# Altium PCB Analizador_PCB.PcbDoc (part 1 of 2)
Units mil, origin at the board's own origin, x right, y up, seen from the top; angles counter-clockwise.
Board outline 3920 x 3040 mil, 2 copper layers (Top Layer, Bottom Layer); 151 components, 106 nets, 476 pads, 730 vias.
Unrouted connection lines stored in the file: 111.
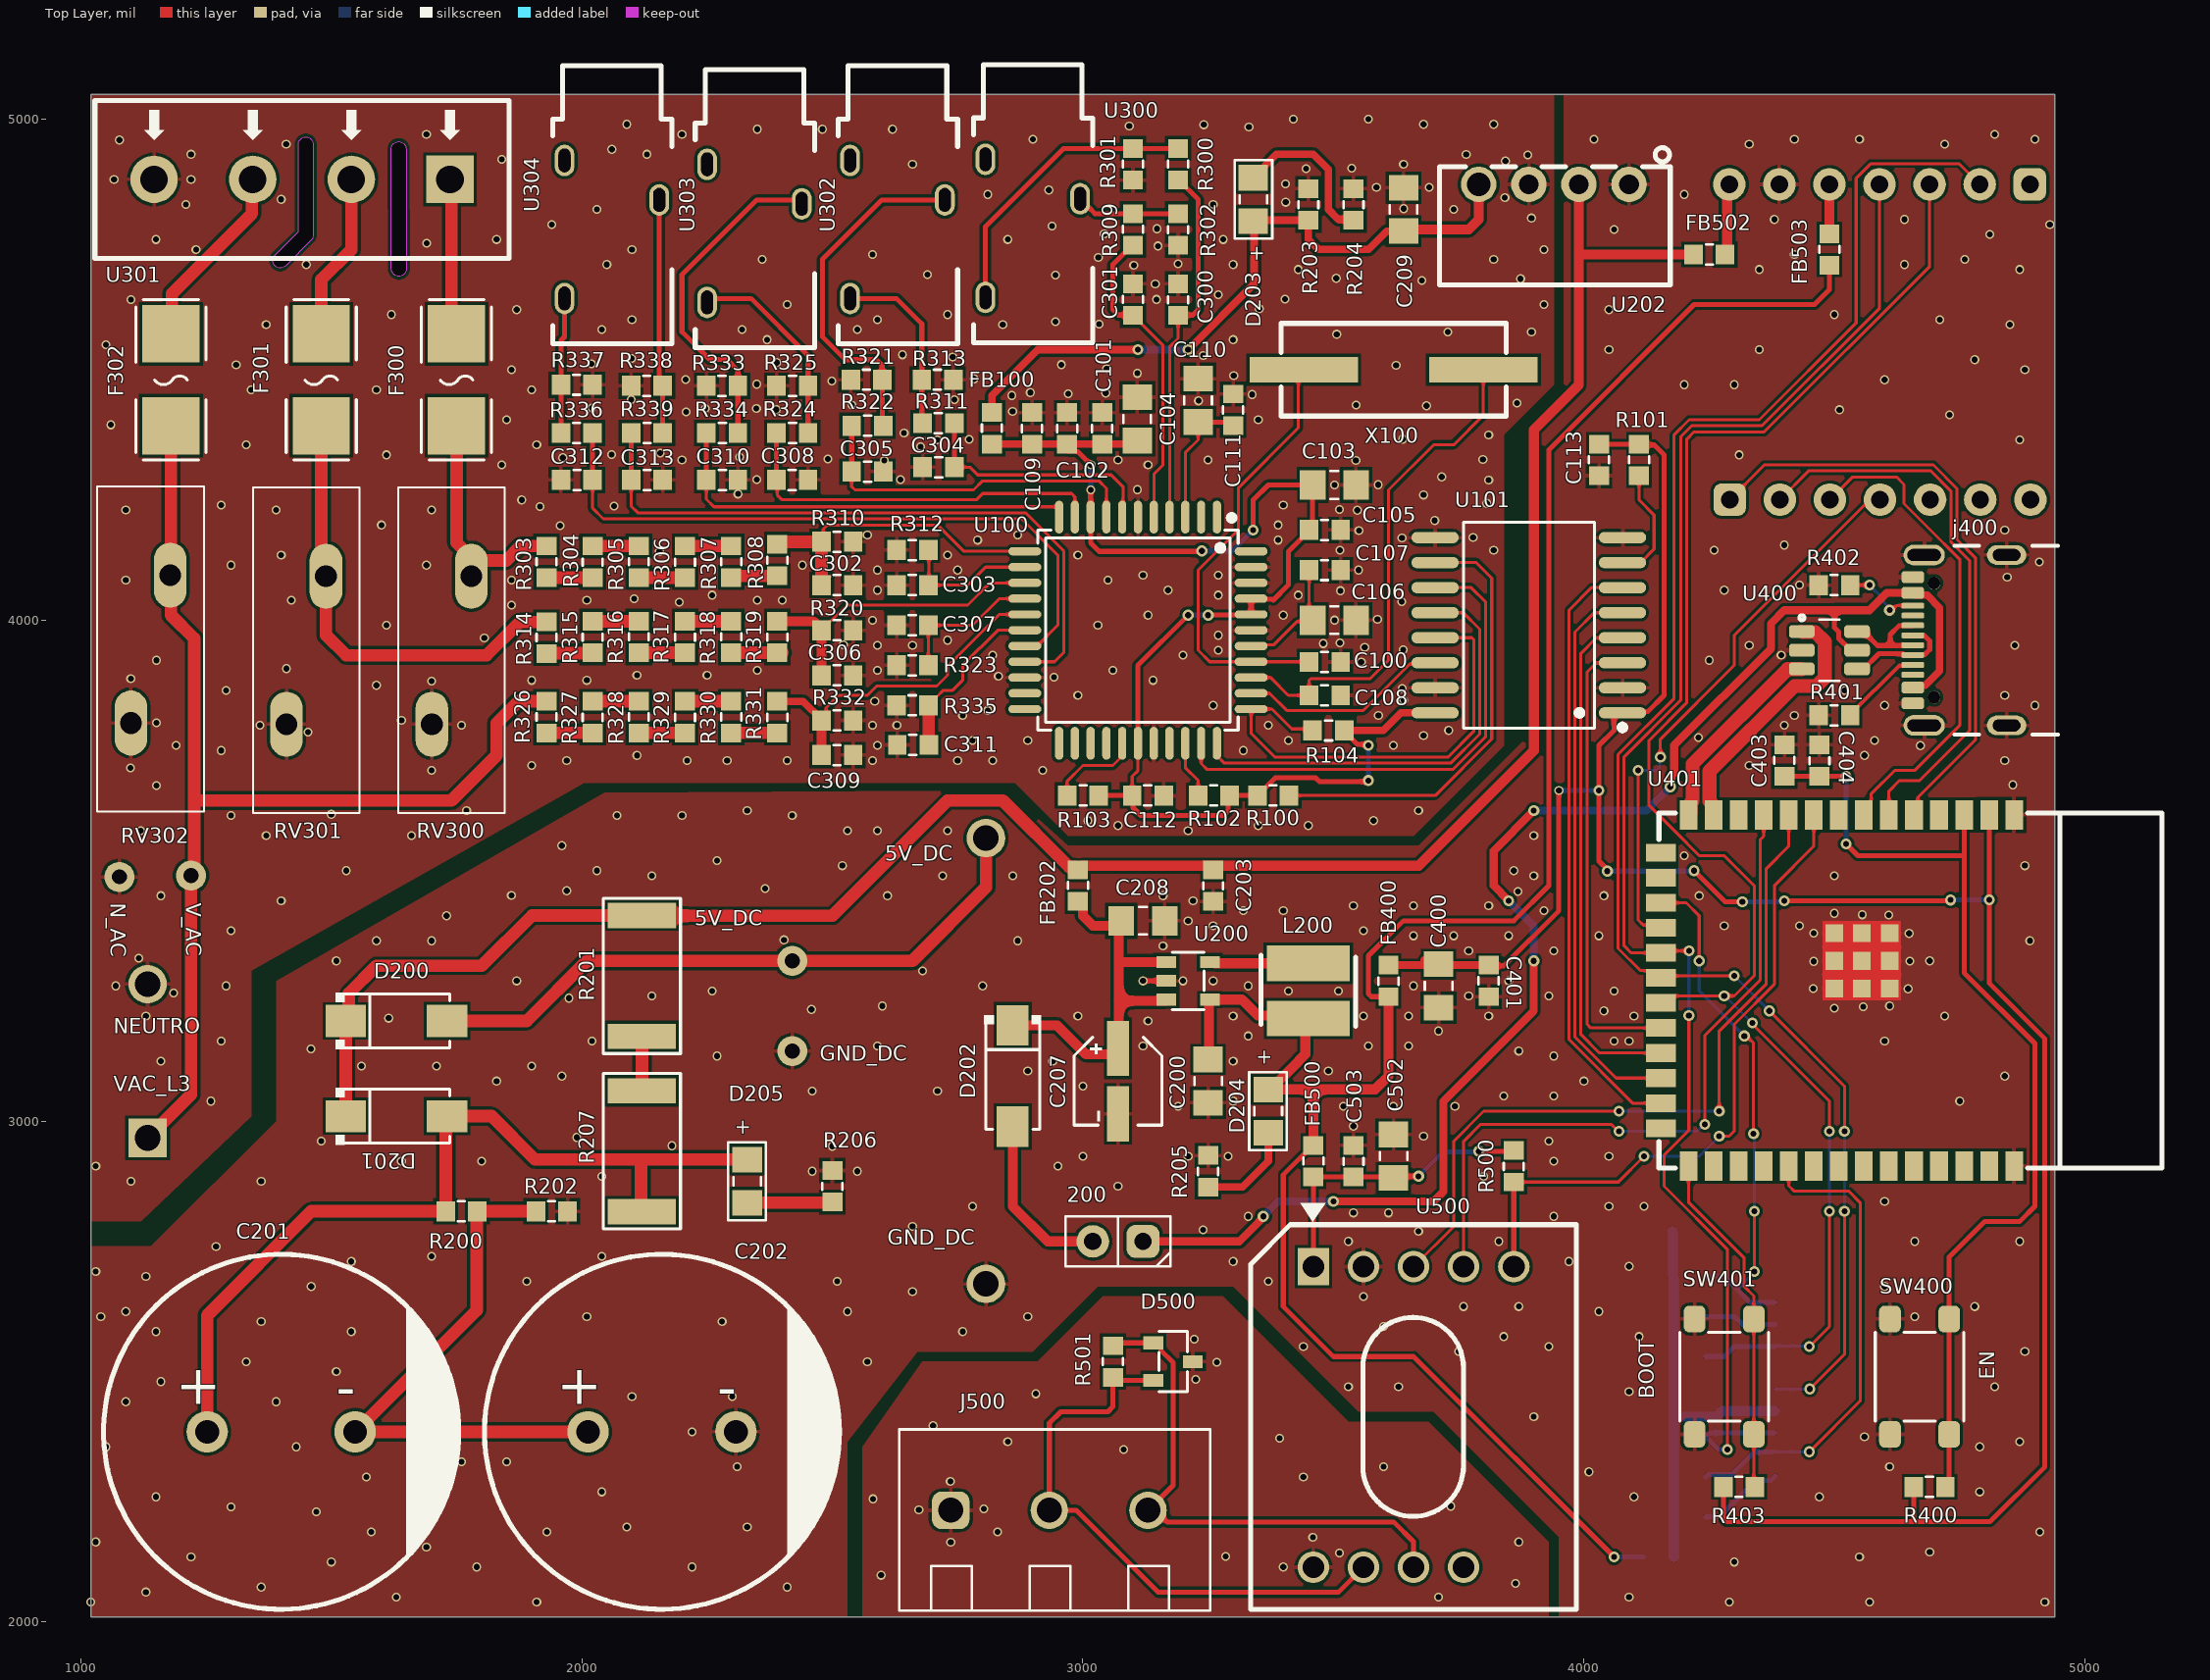
[diagram p0: Top Layer view]
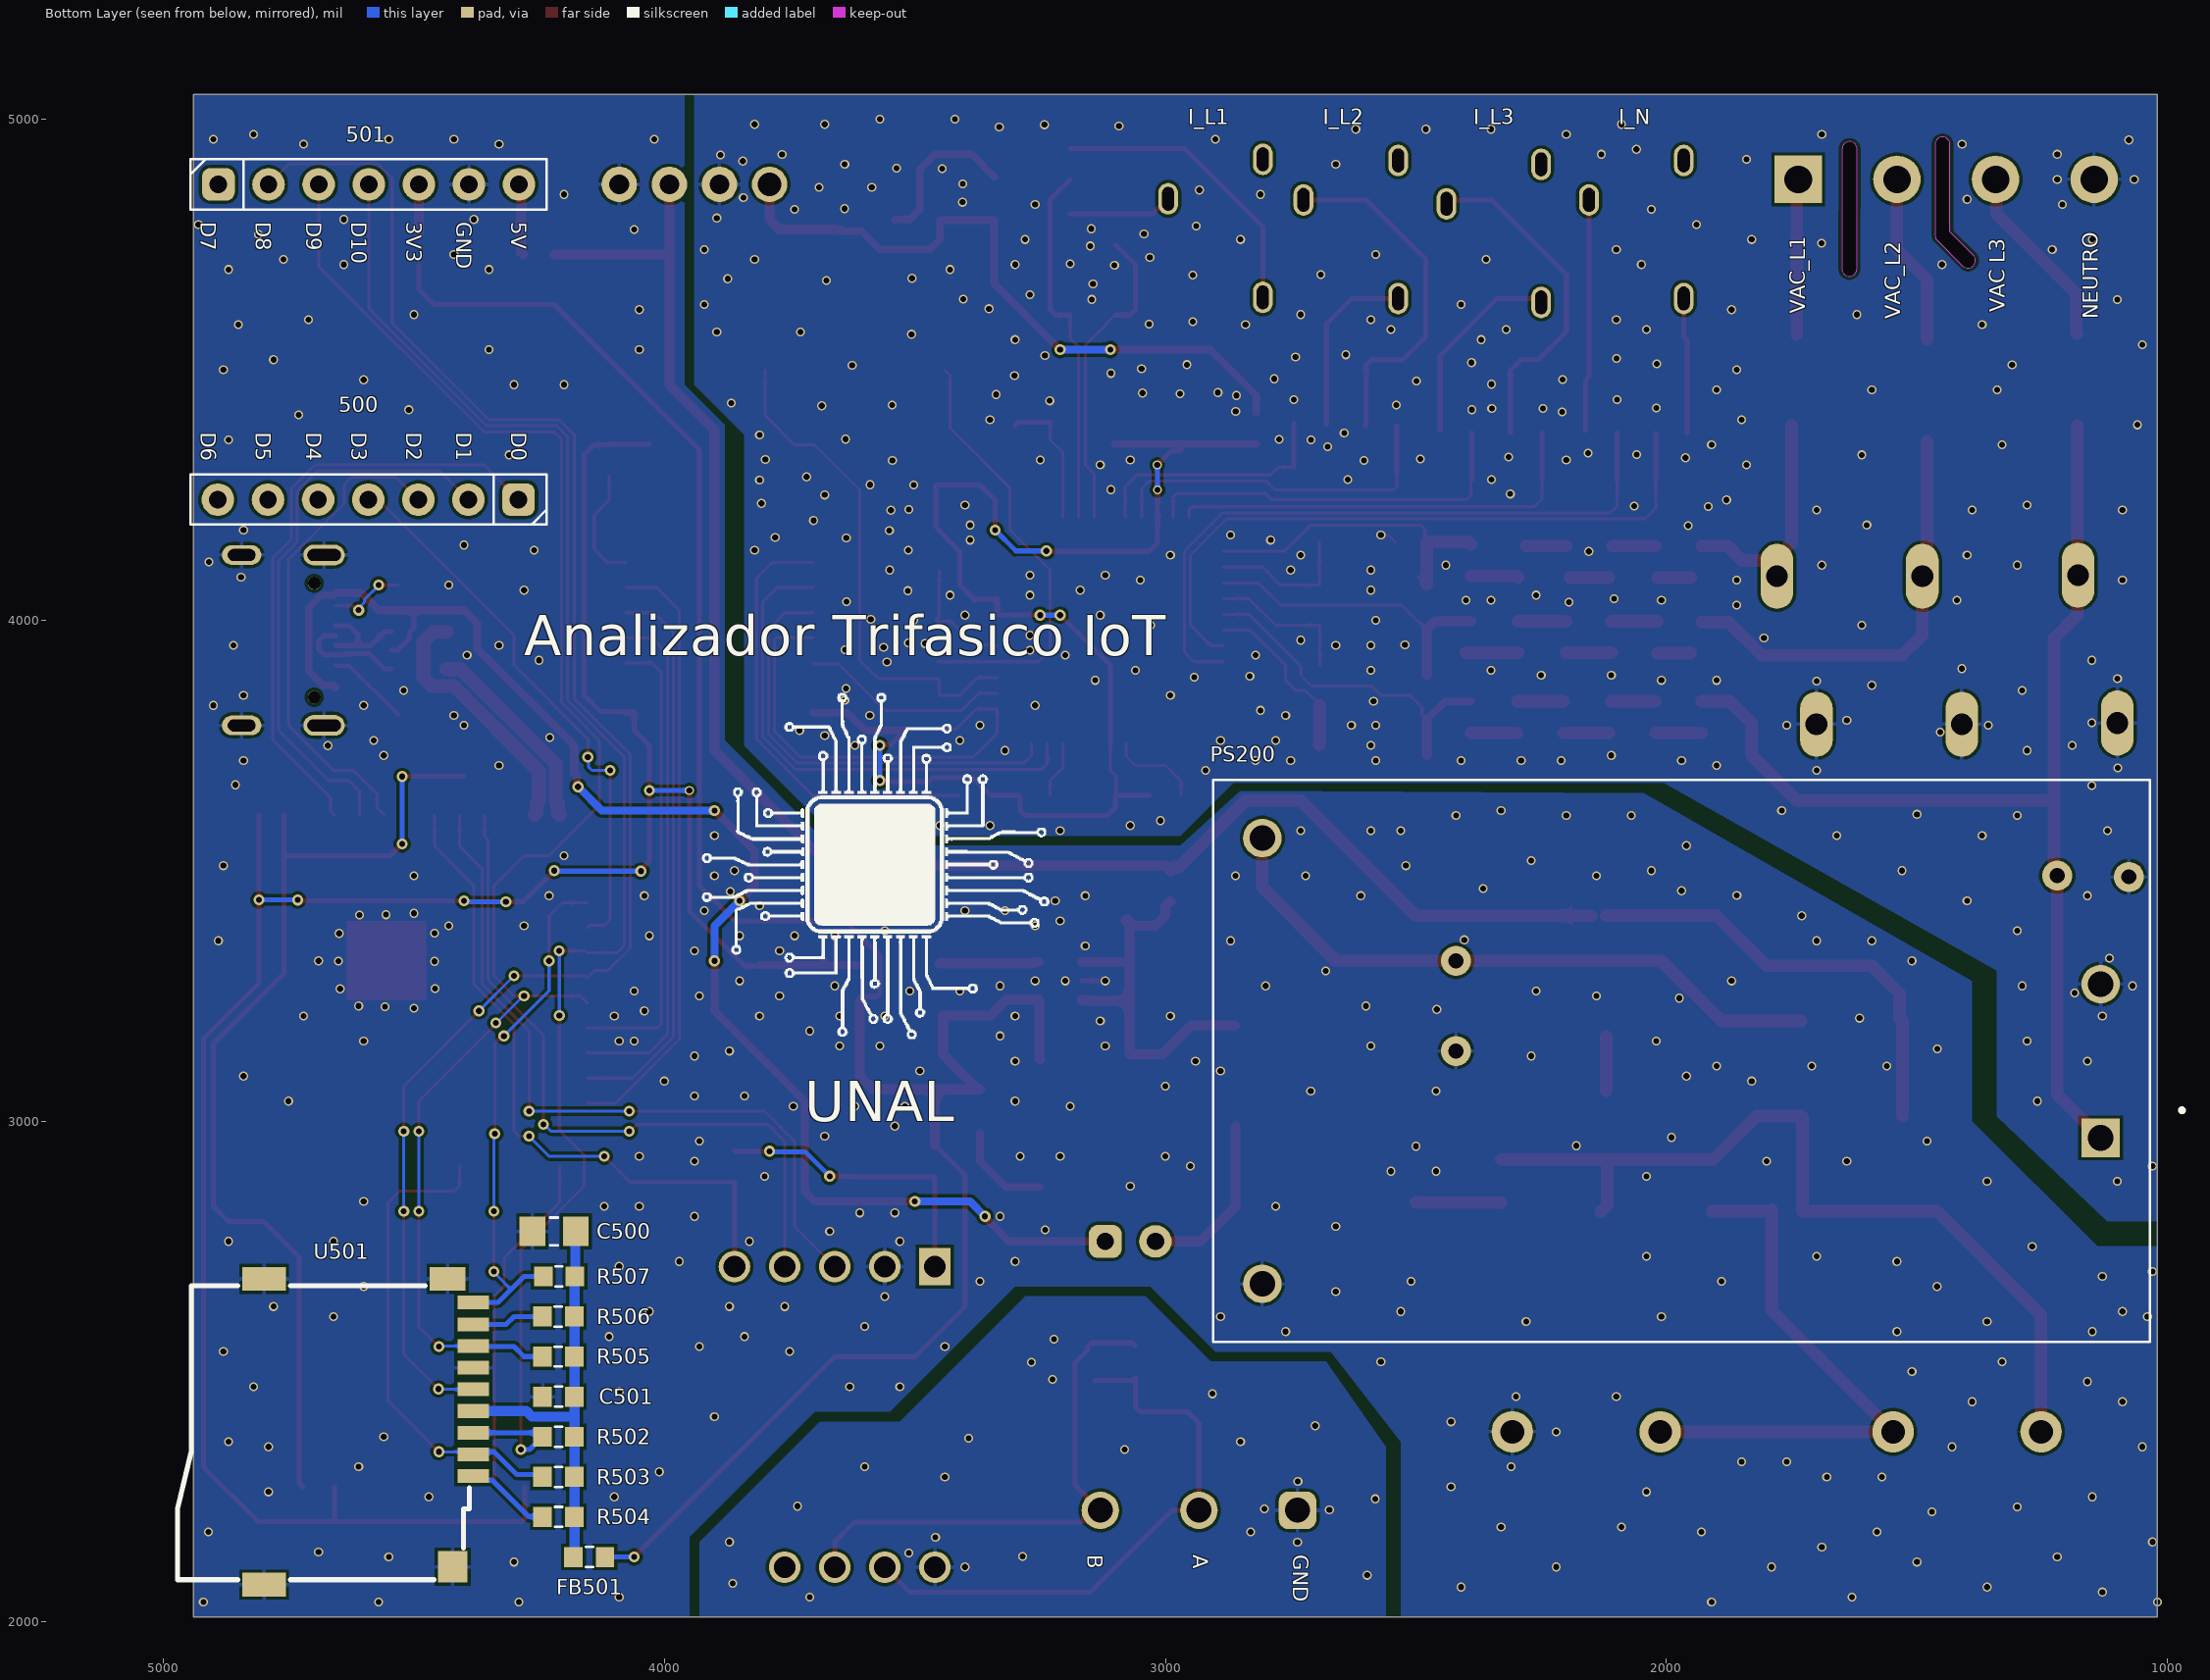
[diagram p1: Bottom Layer view, seen from below]
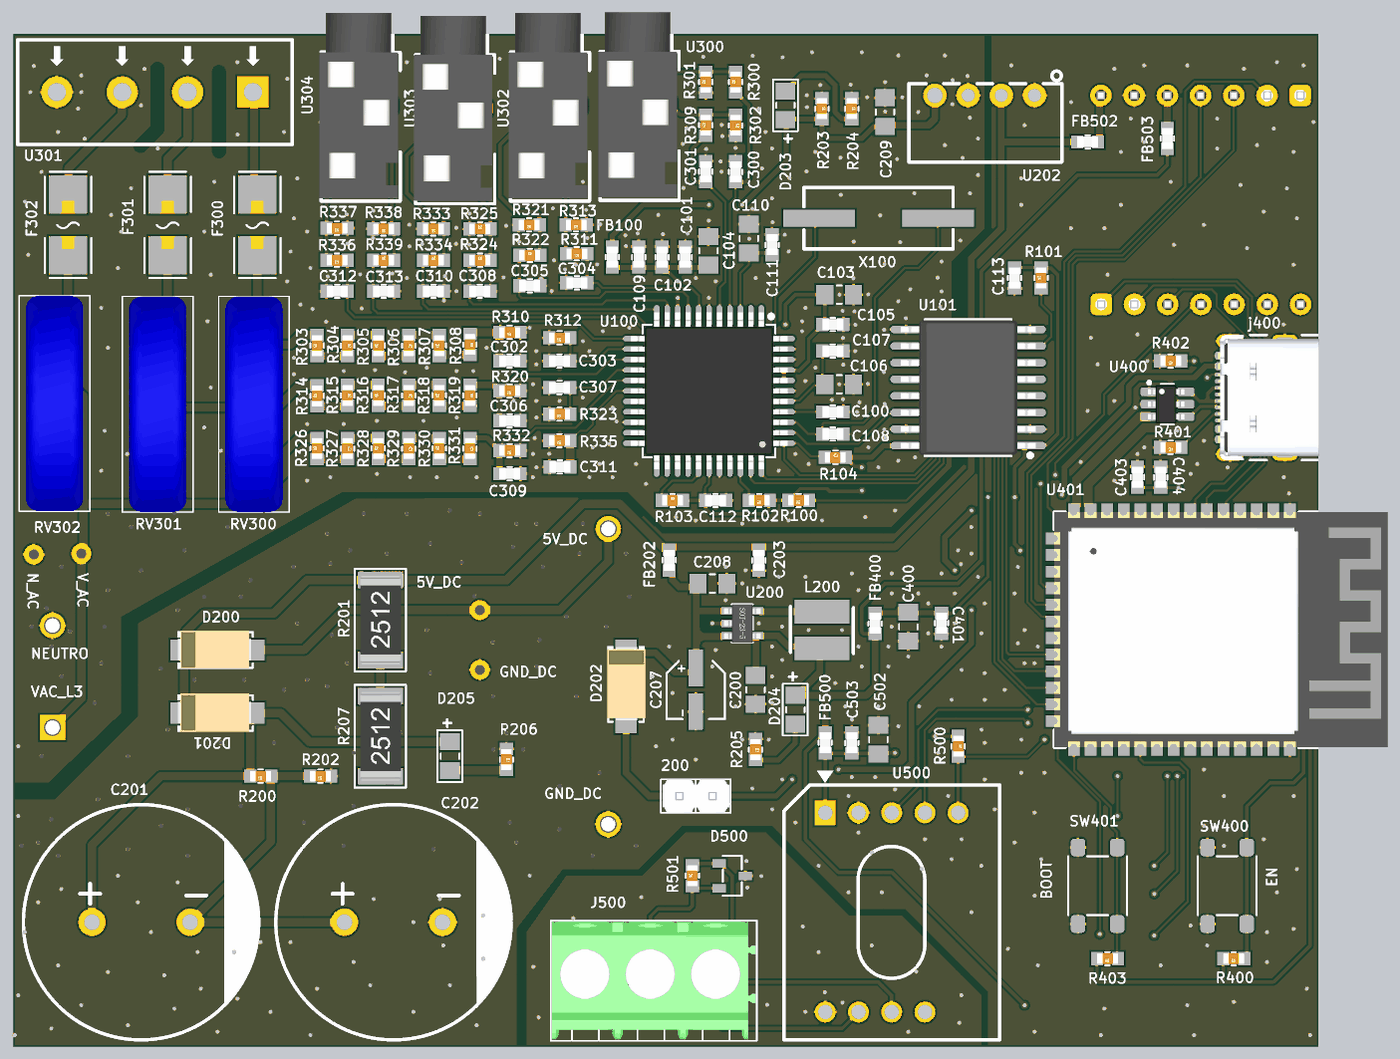
[diagram p3: 3D render of the assembled board from above, using the file's embedded part models]
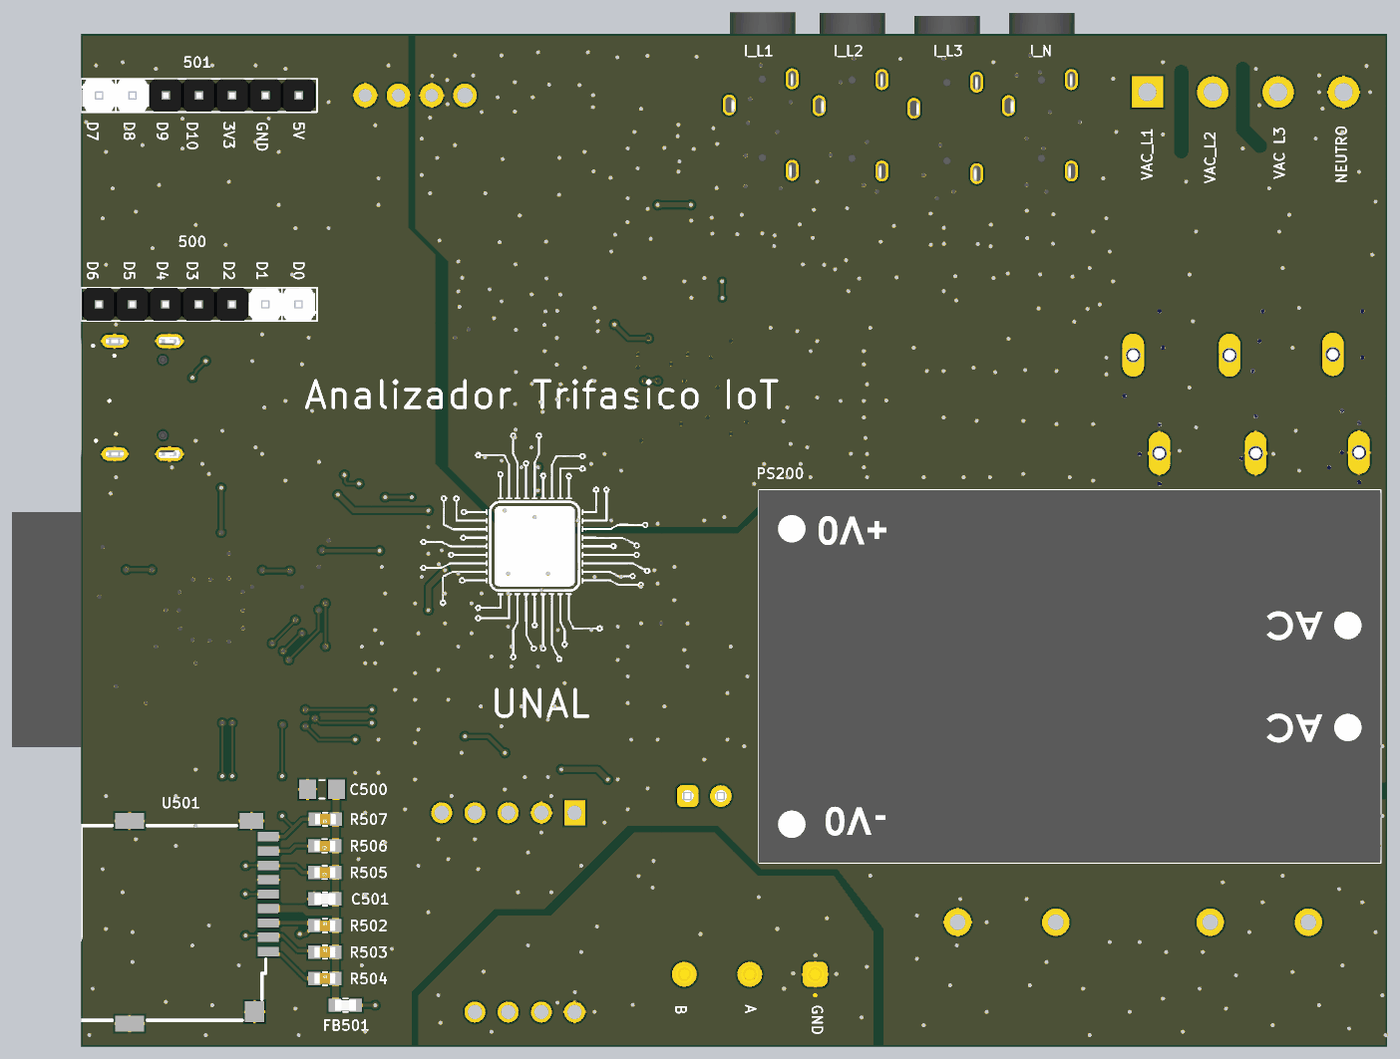
[diagram p4: 3D render of the assembled board from below, using the file's embedded part models]

## Layer stack, top to bottom
Top Solder: solder mask 0.4, Solder Resist, Dk 3.5
Top Layer: signal copper 1.4
Dielectric 1: dielectric 12.6, FR-4, Dk 4.8
Bottom Layer: signal copper 1.4
Bottom Solder: solder mask 0.4, Solder Resist, Dk 3.5

## Board outline
1020,2010 1020,2802.5 1020,4387.5 1020,5050 4940,5050 4940,2010
cut-out: 1619.91,4701.45 1619.45,4940.32 cw(c1634.46,4940.35) 1649.48,4940.38 1649.94,4701.51 1649.94,4701.48 cw(c1634.92,4701.48)
cut-out: 1408.72,4707.48 cw(c1398.1,4718.1) 1387.48,4728.72 1434.02,4775.25 1434.02,4949.63 cw(c1449.03,4949.63) 1464.05,4949.63 1464.05,4769.03 cw(c1449.03,4769.03) 1459.64,4758.4 1459.65,4758.41

## Design rules (kind name [scope] priority, off if disabled: settings)
Clearance Clearance_Vias_General [IsVia] p1: gap=6 ignorepadtopadclearanceinfootprint=FALSE
Clearance [All] p2: gap=6 ignorepadtopadclearanceinfootprint=FALSE
DiffPairsRouting [All] p1: maxlimit=6 minlimit=6 mostfreqgap=6 toplayer_minwidth=10 toplayer_maxwidth=28 toplayer_prefwidth=28 bottomlayer_minwidth=10 bottomlayer_maxwidth=28 bottomlayer_prefwidth=28 maxuncoupledlength=500
HoleSize [All] p1: absolutevalues=TRUE maxlimit=200 minlimit=12 maxpercent=80.000 minpercent=20.000
MinimumAnnularRing [All] p1: minimumring=3
MinimumSolderMaskSliver [All] p1: minsoldermaskwidth=4
PolygonConnect PolygonConnect_1 [IsVia And (InNet('DGND') Or InNet('AGND') Or InNet('RGND'))] p1: thpad.connectstyle=Relief thpad.reliefconductorwidth=10 thpad.reliefentries=4 thpad.polygonreliefangle="90 Angle" thpad.airgapwidth=10 smdpad.connectstyle=Relief smdpad.reliefconductorwidth=10 smdpad.reliefentries=4 smdpad.polygonreliefangle="90 Angle" smdpad.airgapwidth=10 via.connectstyle=Direct via.reliefconductorwidth=10 via.reliefentries=4 via.polygonreliefangle="90 Angle" via.airgapwidth=10
PolygonConnect [All] p2: connectstyle=Relief reliefconductorwidth=8 reliefentries=4 polygonreliefangle="90 Angle" airgapwidth=6
RoutingVias [All] p1: holewidth=12 width=22 viastyle="Through Hole" minholewidth=12 minwidth=18 maxholewidth=30 maxwidth=40
SilkToSilkClearance [All] p1: silktosilkclearance=2
SilkToSolderMaskClearance [IsPad] p1: minsilkscreentomaskgap=0.1 clearancetoexposedcopper=TRUE
SolderMaskExpansion SolderMaskExpansion_Vias [IsVia] p1: expansion=2 istentingtop=TRUE
SolderMaskExpansion [All] p2: expansion=2 istentingtop=FALSE
SupplyNets "Schematic Supply Nets_10" [InNet('DGND')] p1: voltage=0.000
SupplyNets "Schematic Supply Nets_9" [InNet('RGND')] p2: voltage=0.000
SupplyNets "Schematic Supply Nets_8" [InNet('3v3_ENER_IC')] p3: voltage=0.000
SupplyNets "Schematic Supply Nets_7" [InNet('3v3_MCU')] p4: voltage=0.000
SupplyNets "Schematic Supply Nets_6" [InNet('Vin_buck_5V')] p5: voltage=0.000
SupplyNets "Schematic Supply Nets_5" [InNet('3v3_RS485')] p6: voltage=0.000
SupplyNets "Schematic Supply Nets_4" [InNet('3v3_SD')] p7: voltage=0.000
SupplyNets "Schematic Supply Nets_3" [InNet('DVCC_3v3')] p8: voltage=0.000
SupplyNets "Schematic Supply Nets_2" [InNet('5V_USB')] p9: voltage=0.000
SupplyNets "Schematic Supply Nets_1" [InNet('AGND')] p10: voltage=0.000
SupplyNets "Schematic Supply Nets" [InNet('AVCC_3v3')] p11: voltage=0.000
Width Width_L [InNet('AVCC_3v3')] p1: maxlimit=100 minlimit=6 preferedwidth=25
Width Width_POWER [InNet('3v3_ENER_IC')or InNet('3v3_MCU')or InNet('3v3_RS485')or InNet('3v3_SD')] p2: maxlimit=100 minlimit=6 preferedwidth=25
Width [All] p3: maxlimit=100 minlimit=6 preferedwidth=10
25 further rules are at their usual default settings.

## Classes and differential pairs
component class Designator: C300 C301 C302 C303 C304 C305 C306 C307 C308 C309 C310 C311 C312 C313 F300 F301 F302 R300 R301 R302 R303 R304 R305 R306 R307 R308 R309 R310 R311 R312 R313 R314 R315 R316 R317 R318 R319 R320 R321 R322 R323 R324 R325 R326 R327 R328 R329 R330 R331 R332 R333 R334 R335 R336 R337 R338 R339 RV300 RV301 RV302 U300 U301 U302 U303 U304
differential pair USBC: +USBC_P -USBC_N
differential pair USB: +USB_P -USB_N

## Components (designator, comment, footprint, x,y, rotation, side; value= is the part's Value field where it differs from the comment)
200 "2x1" H_2x1_TH_100mil 3070,2760 r180 top
500 "7x1" H_7x1_TH_100mil 4591,4240.72 r0 bottom locked
501 "7x1" H_7x1_TH_100mil 4590,4870 r180 bottom locked
C100 "YAGEO CC0603JRNPO9BN150" 0603_cap 3483,3916.6 r180 top value=15pF
C101 "CL10B105KB8NQNC" 0603_cap 3038.5,4383 r270 top value=1uF
C102 "AIDE CAPACITOR 0603X7R104K250NT" 0603_cap 2968.5,4383 r270 top value=100nF
C103 "muRata GRM21BR61C106KE15L" 0805_cap 3501.9,4270 r180 top value=10uF
C104 "muRata GRM21BR61C106KE15L" 0805_cap 3108.5,4401.9 r270 top value=10uF
C105 "AIDE CAPACITOR 0603X7R104K250NT" 0603_cap 3483,4180 r180 top value=100nF
C106 "muRata GRM21BR61C106KE15L" 0805_cap 3501.9,4000 r180 top value=10uF
C107 "AIDE CAPACITOR 0603X7R104K250NT" 0603_cap 3483,4100 r180 top value=100nF
C108 "YAGEO CC0603JRNPO9BN150" 0603_cap 3483,3850 r180 top value=15pF
C109 "AIDE CAPACITOR 0603X7R104K250NT" 0603_cap 2898.5,4383 r270 top value=100nF
C110 "muRata GRM21BR61C106KE15L" 0805_cap 3230,4438.9 r270 top value=10uF
C111 "AIDE CAPACITOR 0603X7R104K250NT" 0603_cap 3300,4420 r270 top value=100nF
C112 "AIDE CAPACITOR 0603X7R104K250NT" 0603_cap 3130,3650 r180 top value=100nF
C113 "AIDE CAPACITOR 0603X7R104K250NT" 0603_cap 4030,4320 r90 top value=100nF
C200 "muRata GRM21BR61C106KE15L" 0805_cap 3250,3080 r90 top value=10uF
C201 "hp-2r7-j306vyj23" CAP-TH_BD18.0-P7.50-D0.8-FD-H26.0 1400,2380 r0 top value=30F
C202 "hp-2r7-j306vyj23" CAP-TH_BD18.0-P7.50-D0.8-FD-H26.0 2160,2380 r0 top value=30F
C203 "Samsung Electro-Mechanics" 0603_cap 3260,3470 r270 top value=4.7uF
C207 "rvt1e4r7m0405" CAP-SMD_BD4.0-L4.3-W4.3-FD 3070,3080 r270 top value=4.7uF
C208 "muRata GRM21BR61C106KE15L" 0805_cap 3120,3400 r180 top value=10uF
C209 "muRata GRM21BR61C106KE15L" 0805_cap 3640,4820 r270 top value=10uF
C300 "AIDE CAPACITOR 0603X7R333J500NT" 0603_cap 3190,4640 r270 top value=33nF
C301 "AIDE CAPACITOR 0603X7R333J500NT" 0603_cap 3100,4640 r90 top value=33nF
C302 "AIDE CAPACITOR 0603X7R333J500NT" 0603_cap 2510,4070 r180 top value=33nF
C303 "AIDE CAPACITOR 0603X7R333J500NT" 0603_cap 2660,4070 r180 top value=33nF
C304 "AIDE CAPACITOR 0603X7R333J500NT" 0603_cap 2711.88,4305.51 r0 top value=33nF
C305 "AIDE CAPACITOR 0603X7R333J500NT" 0603_cap 2570,4296.65 r0 top value=33nF
C306 "AIDE CAPACITOR 0603X7R333J500NT" 0603_cap 2510,3890 r180 top value=33nF
C307 "AIDE CAPACITOR 0603X7R333J500NT" 0603_cap 2660,3990 r180 top value=33nF
C308 "AIDE CAPACITOR 0603X7R333J500NT" 0603_cap 2420,4280 r180 top value=33nF
C309 "AIDE CAPACITOR 0603X7R333J500NT" 0603_cap 2510,3730.71 r180 top value=33nF
C310 "AIDE CAPACITOR 0603X7R333J500NT" 0603_cap 2280,4280 r0 top value=33nF
C311 "AIDE CAPACITOR 0603X7R333J500NT" 0603_cap 2661.11,3751.14 r180 top value=33nF
C312 "AIDE CAPACITOR 0603X7R333J500NT" 0603_cap 1990,4280 r0 top value=33nF
C313 "AIDE CAPACITOR 0603X7R333J500NT" 0603_cap 2130,4280 r0 top value=33nF
C400 "Chinocera HGC0805R5226K100NSLJ" 0805_cap 3710,3270 r90 top value=22uF
C401 "AIDE CAPACITOR 0603X7R104K250NT" 0603_cap 3810,3280 r90 top value=100nF
C403 "AIDE CAPACITOR 0603X7R104K250NT" 0603_cap 4400,3720 r90 top value=100nF
C404 "CL10B105KB8NQNC" 0603_cap 4470,3720 r270 top value=1uF
C500 "muRata GRM21BR61C106KE15L" 0805_cap 4220,2780 r180 bottom value=10uF
C501 "AIDE CAPACITOR 0603X7R104K250NT" 0603_cap 4211.5,2450 r180 bottom value=100nF
C502 "muRata GRM21BR61C106KE15L" 0805_cap 3620,2930 r270 top value=10uF
C503 "AIDE CAPACITOR 0603X7R104K250NT" 0603_cap 3540,2920 r270 top value=100nF
D200 "ms2a40lws" SMA_L4.4-W2.8-LS5.4-RD 1630,3200 r0 top
D201 "ms2a40lws" SMA_L4.4-W2.8-LS5.4-RD 1630,3010 r0 top
D202 "ms2a40lws" SMA_L4.4-W2.8-LS5.4-RD 2860,3090 r270 top
D203 "2V" 0805_LED 3340,4840 r90 top
D204 "2.9V" 0805_LED 3370,3020 r270 top
D205 "2.9V" 0805_LED 2330,2880 r270 top
D500 "C908219" SOT-23-3_L2.9-W1.3-P1.90-LS2.4-BR 3180,2520 r180 top
F300 "JDTfuse JFC2410-0200TS" FUSE-SMD_L6.1-W2.7 1750,4480 r270 top
F301 "JDTfuse JFC2410-0200TS" FUSE-SMD_L6.1-W2.7 1480,4480 r270 top
F302 "JDTfuse JFC2410-0200TS" FUSE-SMD_L6.1-W2.7 1180,4480 r270 top
FB100 "Yanchuang SCBM160808U090T" 0603_cap 2818.5,4383 r90 top value=0Ω
FB202 "Yanchuang SCBM160808U090T" 0603_cap 2990,3470 r90 top value=0Ω
FB400 "Yanchuang SCBM160808U090T" 0603_cap 3610,3280 r270 top value=0Ω
FB500 "Yanchuang SCBM160808U090T" 0603_cap 3460,2920 r90 top value=0Ω
FB501 "Yanchuang SCBM160808U090T" 0603_cap 4150,2130 r180 bottom value=0Ω
FB502 "Yanchuang SCBM160808U090T" 0603_cap 4250,4730 r0 top value=0Ω
FB503 "Yanchuang SCBM160808U090T" 0603_cap 4490,4740 r90 top value=0Ω
j400 "USB C" CON_USB_C_16P_RA 4750,3960 r90 top value=USB_C
J500 "Connector 3pos" CON_3x1_TH_5mm 2933.05,2223.2 r0 top
L200 "znr4030st3r9m" IND-SMD_L4.0-W4.0_VLCF4028T 3450,3260 r270 top value=3.9uH
PS200 "C52746092" CONV_HLK-10M05 1970,3120 r0 bottom locked value=HI_LINK_5V
R100 "SAE 1RC0603F1002" 0603_RES 3380,3650 r180 top value=10kΩ
R101 "SAE 1RC0603F1002" 0603_RES 4110,4320 r90 top value=10kΩ
R102 "SAE 1RC0603F1002" 0603_RES 3261.5,3650 r180 top value=10kΩ
R103 "FOJAN FRC0603F1001TS" 0603_RES 3000,3650 r0 top value=1kΩ
R104 "SAE 1RC0603F1002" 0603_RES 3490,3780 r0 top value=10kΩ
R200 "FOJAN FRC0603F1001TS" 0603_RES 1760,2820 r180 top value=1kΩ
R201 "RES 3900mΩ ±5% 2W 2512" R2512 2120,3290 r90 top value=3.9Ω
R202 "FOJAN FRC0603F1001TS" 0603_RES 1940,2820 r180 top value=1kΩ
R203 "HWA CHN HRC0603F1200ENTN" 0603_RES 3450,4830 r270 top value=120Ω
R204 "RES 120Ω ±1% 100mW 0603" 0603_RES 3540,4830 r270 top value=120Ω
R205 "84R5 1/10W" 0603_RES 3250,2900 r270 top value=84R5
R206 "330R 1/10W" 0603_res 2500,2870 r270 top value=330R
R207 "RES 3900mΩ ±5% 2W 2512" R2512 2120,2940 r90 top value=3.9Ω
R300 "FOJAN FRC0603F1001TS" 0603_RES 3190,4910 r90 top value=1kΩ
R301 "SEI(Stackpole Electronics Inc.)" 0603_RES 3100,4910 r90 top value=5.1Ω
R302 "SEI(Stackpole Electronics Inc.)" 0603_RES 3190,4780 r270 top value=5.1Ω
R303 "BOURNS CR0603-FX-1653ELF" 0603_RES 1929.63,4116.5 r90 top value=165kΩ
R304 "BOURNS CR0603-FX-1653ELF" 0603_RES 2021.7,4116.5 r270 top value=165kΩ
R305 "BOURNS CR0603-FX-1653ELF" 0603_RES 2113.78,4116.5 r90 top value=165kΩ
R306 "BOURNS CR0603-FX-1653ELF" 0603_RES 2205.85,4116.5 r270 top value=165kΩ
R307 "BOURNS CR0603-FX-1653ELF" 0603_RES 2297.93,4116.5 r90 top value=165kΩ
R308 "BOURNS CR0603-FX-1653ELF" 0603_RES 2390,4120 r270 top value=165kΩ
R309 "FOJAN FRC0603F1001TS" 0603_RES 3100,4780 r90 top value=1kΩ
R310 "FOJAN FRC0603F1001TS" 0603_RES 2510,4156.5 r180 top value=1kΩ
R311 "FOJAN FRC0603F1001TS" 0603_RES 2711.88,4393.25 r180 top value=1kΩ
R312 "FOJAN FRC0603F1001TS" 0603_RES 2660,4140 r180 top value=1kΩ
R313 "SEI(Stackpole Electronics Inc.)" 0603_RES 2710,4480 r180 top value=5.1Ω
R314 "BOURNS CR0603-FX-1653ELF" 0603_RES 1929.63,3965 r90 top value=165kΩ
R315 "BOURNS CR0603-FX-1653ELF" 0603_RES 2021.7,3966.5 r270 top value=165kΩ
R316 "BOURNS CR0603-FX-1653ELF" 0603_RES 2113.78,3966.5 r90 top value=165kΩ
R317 "BOURNS CR0603-FX-1653ELF" 0603_RES 2205.85,3966.5 r270 top value=165kΩ
R318 "BOURNS CR0603-FX-1653ELF" 0603_RES 2297.93,3966.5 r90 top value=165kΩ
R319 "BOURNS CR0603-FX-1653ELF" 0603_RES 2390,3966.5 r270 top value=165kΩ
R320 "FOJAN FRC0603F1001TS" 0603_RES 2510,3980 r180 top value=1kΩ
R321 "SEI(Stackpole Electronics Inc.)" 0603_RES 2568.52,4480 r180 top value=5.1Ω
R322 "FOJAN FRC0603F1001TS" 0603_RES 2570,4388.17 r0 top value=1kΩ
R323 "FOJAN FRC0603F1001TS" 0603_RES 2660,3910 r180 top value=1kΩ
R324 "FOJAN FRC0603F1001TS" 0603_RES 2420,4373.68 r0 top value=1kΩ
R325 "SEI(Stackpole Electronics Inc.)" 0603_RES 2420,4467.93 r0 top value=5.1Ω
R326 "BOURNS CR0603-FX-1653ELF" 0603_RES 1929.63,3806.5 r90 top value=165kΩ
R327 "BOURNS CR0603-FX-1653ELF" 0603_RES 2021.7,3806.5 r270 top value=165kΩ
R328 "BOURNS CR0603-FX-1653ELF" 0603_RES 2113.78,3806.5 r90 top value=165kΩ
R329 "BOURNS CR0603-FX-1653ELF" 0603_RES 2205.85,3806.5 r270 top value=165kΩ
R330 "BOURNS CR0603-FX-1653ELF" 0603_RES 2297.93,3806.5 r90 top value=165kΩ
R331 "BOURNS CR0603-FX-1653ELF" 0603_RES 2390,3806.5 r270 top value=165kΩ
R332 "FOJAN FRC0603F1001TS" 0603_RES 2510,3800 r180 top value=1kΩ
R333 "SEI(Stackpole Electronics Inc.)" 0603_RES 2280,4467.93 r180 top value=5.1Ω
R334 "FOJAN FRC0603F1001TS" 0603_RES 2280,4373.68 r0 top value=1kΩ
R335 "FOJAN FRC0603F1001TS" 0603_RES 2660,3830 r180 top value=1kΩ
R336 "FOJAN FRC0603F1001TS" 0603_RES 1990,4373.68 r180 top value=1kΩ
R337 "SEI(Stackpole Electronics Inc.)" 0603_RES 1990,4470 r180 top value=5.1Ω
R338 "SEI(Stackpole Electronics Inc.)" 0603_RES 2130,4467.93 r180 top value=5.1Ω
R339 "FOJAN FRC0603F1001TS" 0603_RES 2130,4373.68 r0 top value=1kΩ
R400 "SAE 1RC0603F1002" 0603_RES 4690,2270 r180 top value=10kΩ
R401 "UNI-ROYAL HP05W3F100JT5E" 0603_RES 4500,3810 r180 top value=5.1k
R402 "UNI-ROYAL HP05W3F100JT5E" 0603_RES 4500,4070 r180 top value=5.1k
R403 "SAE 1RC0603F1002" 0603_RES 4310,2270 r180 top value=10kΩ
R500 "SAE 1RC0603F1002" 0603_RES 3860,2910 r270 top value=10kΩ
R501 "RES 120Ω ±1% 100mW 0603" 0603_RES 3060,2520 r90 top value=120Ω
R502 "SAE 1RC0603F1002" 0603_RES 4211.5,2370 r180 bottom value=10kΩ
R503 "SAE 1RC0603F1002" 0603_RES 4211.5,2290 r180 bottom value=10kΩ
R504 "SAE 1RC0603F1002" 0603_RES 4211.5,2210 r180 bottom value=10kΩ
R505 "SAE 1RC0603F1002" 0603_RES 4211.5,2530 r0 bottom value=10kΩ
R506 "SAE 1RC0603F1002" 0603_RES 4211.5,2610 r0 bottom value=10kΩ
R507 "SAE 1RC0603F1002" 0603_RES 4210,2690 r0 bottom value=10kΩ
RV300 "MOV-14D471K" MOV14D471K 1740,3940 r270 top
RV301 "MOV-14D471K" MOV14D471K 1450,3940 r270 top
RV302 "MOV-14D471K" MOV14D471K 1139.37,3942.36 r270 top
SW400 "Sw" Sw_PUSH_4.5x4.5x5mm 4670,2490 r90 top
SW401 "Sw" Sw_PUSH_4.5x4.5x5mm 4280,2490 r90 top
U100 "RN8302B(v3)" 3 3110,3980 r180 top
U101 "C571196" SOIC-16_L10.3-W7.5-P1.27-LS10.3-BL 3890,3990 r90 top
U200 "hx1002-gec" SOT-23-5_L2.9-W1.6-P0.95-LS2.9-BL 3210,3280 r270 top
U202 "b0503s-1wr3_c7465187" PWRM-TH_B0503S-1WR2 3940,4870 r180 top
U300 "hx pj-320a-3p dip" AUDIO-SMD_HX-PJ-320A-3P-DIP 2900,4782.2 r270 top
U301 "c50126v-4p0g56" CONN-TH_C50126V-4P0G56 1441.6,4880 r180 top
U302 "hx pj-320a-3p dip" AUDIO-SMD_HX-PJ-320A-3P-DIP 2630,4780 r270 top
U303 "hx pj-320a-3p dip" AUDIO-SMD_HX-PJ-320A-3P-DIP 2344.5,4772.2 r270 top
U304 "hx pj-320a-3p dip" AUDIO-SMD_HX-PJ-320A-3P-DIP 2060,4780 r270 top
U400 "USBLC6-2SC6" SOT_23_6 4490,3940 r0 top
U401 "esp32-s3-wroom-1-n4" WIFIM-SMD_ESP32-S3-WROOM-1-N8 4506.3,3261 r270 top
U500 "rsm3485pct" COMM-TH_RSM3485PCT 3660,2409.6 r270 top
U501 "tf-card-9p" SIM-SMD_LX_XDFP-0090-012 4590,2380 r270 bottom locked
X100 "049ss2-8.192f12dzlal" HC-49S_L11.4-W4.7-LS12.7 3620,4500 r0 top value=8.192MHz

## Footprints (in the part's own frame and the unit in brackets; to place one, negate y for a bottom-side part, rotate by r counter-clockwise, add the part's x,y. Pads: shape width x height; smd on the part's side, far side on the other; paste and mask are expansions set on the pad)
3 [mil]
  oval 16.5x65.7 smd: 1(-157.5,-225.8) 2(-126,-225.8) 3(-94.5,-225.8) 4(-63,-225.8) 5(-31.5,-225.8) 6(0,-225.8) 7(31.5,-225.8) 8(63,-225.8) 9(94.5,-225.8) 10(125.9,-225.8) 11(157.4,-225.8) 23(157.4,225.8) 24(125.9,225.8) 25(94.5,225.8) 26(63,225.8) 27(31.5,225.8) 28(0,225.8) 29(-31.5,225.8) 30(-63,225.8) 31(-94.5,225.8) 32(-126,225.8) 33(-157.5,225.8)
  oval 65.7x16.5 smd: 12(225.8,-157.5) 13(225.8,-126) 14(225.8,-94.5) 15(225.8,-63) 16(225.8,-31.5) 17(225.8,0) 18(225.8,31.5) 19(225.8,63) 20(225.8,94.5) 21(225.8,125.9) 22(225.8,157.4) 34(-225.8,157.4) 35(-225.8,125.9) 36(-225.8,94.5) 37(-225.8,63) 38(-225.8,31.5) 39(-225.8,0) 40(-225.8,-31.5) 41(-225.8,-63) 42(-225.8,-94.5) 43(-225.8,-126) 44(-225.8,-157.5)
  silkscreen extent -200,-230 200,200, body extent -236,-236 236,236, height 59
0603_cap [mil]
  rect 37x40 smd: 1(-31.5,0) 2(31.5,0)
  silkscreen extent -7,-20 8,20, body extent -31,-17 31,17, height 34
0603_RES [mil]
  rect 37x40 smd: 1(-31.5,0) 2(31.5,0)
  silkscreen extent -7,-20 8,20, body extent -31,-16 32,16, height 12
0603_res [mil]
  rect 37x40 smd: 1(-31.5,0) 2(31.5,0)
  silkscreen extent -7,-20 8,20, body extent -31,-16 32,16, height 12
0805_cap [mm]
  rect 1.3x1.5 smd: 1(-1.1,0) 2(1.1,0)
  silkscreen extent -0.2,-0.7 0.2,0.7, body extent -1.13,-0.7 1.07,0.7, height 1
0805_LED [mm]
  rect 1.3x1.5 smd: 1(-1.1,0) 2(1.1,0)
  silkscreen extent -1.98,-0.97 1.98,0.94, body extent -1,-0.62 1,0.63, height 1.1
AUDIO-SMD_HX-PJ-320A-3P-DIP [mil]
  oval 63x39.4 hole 23.6 slot 47.2 at 0 deg: 2(-59,94.5) 3(-137.8,-94.5) 4(137.8,-94.5)
  silkscreen extent -327,-118 228,120, body extent -338,-123 219,113, height 197
CAP-SMD_BD4.0-L4.3-W4.3-FD [mil]
  rect 110.2x43.3 smd: 1(-65.4,0) 2(65.4,0)
  silkscreen extent -87,-88 88,88
CAP-TH_BD18.0-P7.50-D0.8-FD-H26.0 [mil]
  round 82.7 hole 47.2 paste-99999 mask+2: 1(-147.7,0) 2(147.6,0)
  silkscreen extent -354,-354 354,354, body extent -359,-354 349,354, height 630
COMM-TH_RSM3485PCT [mil]
  rect 74.8x63 hole 43.3: 1(-300,-200)
  round 63 hole 43.3: 2(-300,-100) 3(-300,0) 4(-300,100) 5(-300,200) 7(300,100) 8(300,0) 9(300,-100) 10(300,-200)
  silkscreen extent -427,-325 384,325, body extent -385,-325 385,325, height 280
CON_3x1_TH_5mm [mm]
  rrect50% 1.9x1.9 hole 1.27: 1(-5,0)
  round 1.9 hole 1.27: 2(0,0) 3(5,0)
  silkscreen extent -7.6,-5.08 8.15,4.1, body extent -7.51,-4.99 8.06,4.01, height 11.7
CON_USB_C_16P_RA [mm]
  oval 1x2 hole 0.6 slot 1.4 at 90 deg: 0(-4.32,-2.377) 0(4.32,-2.377)
  oval 1.05x2.1 hole 0.6 slot 1.7 at 90 deg: 0(-4.32,1.803) 0(4.32,1.803)
  rrect50% 0.6x1.15 smd mask+0.046: A1/B12(-3.2,2.378) A4/B9(-2.4,2.378) B1/A12(3.2,2.378) B4/A9(2.4,2.378)
  rrect50% 0.3x1.15 smd mask+0.046: A5(-1.25,2.378) A6(-0.25,2.378) A7(0.25,2.378) A8(1.25,2.378) B5(1.75,2.378) B6(0.75,2.378) B7(-0.75,2.378) B8(-1.75,2.378)
  round 0.65 hole 0.65 unplated mask+0.025: ""(-2.89,1.303) ""(2.89,1.303)
  silkscreen extent -4.79,-4.98 4.79,0.27, body extent -4.79,-4.98 4.79,2.73, height 3.31
CONN-TH_C50126V-4P0G56 [mil]
  rect 94.5x94.5 hole 55.1 paste-99999 mask+2: 1(-295.3,0)
  round 94.5 hole 55.1 paste-99999 mask+2: 2(-98.4,0) 3(98.4,0) 4(295.3,0)
  silkscreen extent -413,-157 413,158
CONV_HLK-10M05 [mm]
  rect 1.95x1.95 / inner round 1.95 / far side rect 1.95x1.95 hole 1.3: 1(-21.25,3.9)
  round 1.95 hole 1.3: 2(-21.25,-3.9) 3(21.25,11.3) 4(21.25,-11.3)
  silkscreen extent -25.47,-14.25 23.75,14.25, body extent -23.75,-14.25 23.75,14.25, height 22
FUSE-SMD_L6.1-W2.7 [mil]
  rect 114.6x114.4 smd paste-3937: 1(-91.7,0) 2(91.7,0)
  silkscreen extent -160,-70 160,70, body extent -115,-50 125,50, height 85
H_2x1_TH_100mil [mil]
  rrect50% 65x65 hole 35: 1(-50,0)
  round 65 hole 35: 2(50,0)
  silkscreen extent -105,-50 105,50, body extent -101,-49 99,49, height 339
H_7x1_TH_100mil [mil]
  rrect50% 65x65 hole 35: 1(-300,0)
  round 65 hole 35: 2(-200,0) 3(-100,0) 4(0,0) 5(100,0) 6(200,0) 7(300,0)
  silkscreen extent -356,-50 355,50, body extent -351,-49 350,49, height 339
HC-49S_L11.4-W4.7-LS12.7 [mil]
  rect 216.5x51.2 smd: 1(-179.2,0) 2(179.3,0)
  silkscreen extent -224,-92 225,92
IND-SMD_L4.0-W4.0_VLCF4028T [mil]
  rect 70.9x165.4 smd: 1(-55.1,0) 2(55.1,0)
  silkscreen extent -71,-95 71,95, body extent -80,-75 80,75, height 118
MOV14D471K [mm]
  oval 3.3x1.65 hole 1.1: 1(-3.75,1) 2(3.75,-1)
  silkscreen extent -8.25,-2.7 8.25,2.7, body extent -8.25,-2.2 8.25,2.2, height 20
PWRM-TH_B0503S-1WR2 [mm]
  round 1.8 hole 1: 1(-3.81,0) 2(-1.27,0) 3(1.27,0)
  round 1.8 hole 1.2: 4(3.81,0)
  silkscreen extent -5.9,-1.86 5.8,5.1, body extent -5.97,-1.02 5.71,5.08, height 10
R2512 [mil]
  rect 50.5x136.1 smd paste-3937: 1(-120.8,0) 2(120.7,0)
  silkscreen extent -155,-77 155,77, body extent -134,-62 134,60, height 24
SIM-SMD_LX_XDFP-0090-012 [mil]
  rect 27.6x63 smd: 1(88.6,208.7) 2(45.3,208.7) 3(2,208.7) 4(-41.3,208.7) 5(-84.6,208.7) 6(-127.9,208.7) 7(-171.2,208.7) 8(-214.5,208.7) 9(-257.8,208.7)
  rect 47.2x86.6 smd: 10(-305.1,-208.7) 10(305.2,-208.7)
  rect 47.2x70.9 smd: 10(-305.1,157.5)
  rect 63x59.1 smd: 10(269.7,167.3)
  silkscreen extent -291,-382 295,201
SMA_L4.4-W2.8-LS5.4-RD [mil]
  rect 80.57x63.78 smd: 1(-101,0) 2(101,0)
  silkscreen extent -121,-57 106,57, body extent -119,-56 101,58, height 93
SOIC-16_L10.3-W7.5-P1.27-LS10.3-BL [mil]
  oval 22.6x94.5 smd: 1(-175,-187) 2(-125,-187) 3(-75,-187) 4(-25,-187) 5(25,-187) 6(75,-187) 7(125,-187) 8(175,-187) 9(175,187) 10(125,187) 11(75,187) 12(25,187) 13(-25,187) 14(-75,187) 15(-125,187) 16(-175,187)
  silkscreen extent -210,-193 206,131, body extent -203,-203 203,203, height 102
SOT-23-3_L2.9-W1.3-P1.90-LS2.4-BR [mil]
  rect 39.4x25.6 smd: 1(39.3,-37.4) 2(39.3,37.4) 3(-39.4,0)
  silkscreen extent -29,-60 29,60
SOT-23-5_L2.9-W1.6-P0.95-LS2.9-BL [mm]
  rect 0.6x1 smd paste+0: 1(-0.95,-1.1) 2(0,-1.1) 3(0.95,-1.1) 4(0.95,1.1) 5(-0.95,1.1)
  silkscreen extent -1.45,-0.8 1.45,0.8, body extent -1.45,-1.4 1.45,1.4, height 1.2
SOT_23_6 [mm]
  rrect50% 1.3x0.65 smd: 1(-1.4,0.95) 2(-1.4,0) 3(-1.4,-0.95) 4(1.4,-0.95) 5(1.4,0) 6(1.4,0.95)
  silkscreen extent -1.52,-1.55 0.5,1.78, body extent -1.5,-1.45 1.3,1.45, height 1.45
Sw_PUSH_4.5x4.5x5mm [mm]
  rrect50% 1.35x1.1 smd: 1(-2.925,1.5) 1(2.925,1.5) 2(-2.925,-1.5) 2(2.925,-1.5)
  silkscreen extent -2.25,-2.25 2.25,2.25, body extent -2.25,-2.25 2.25,2.25, height 5
WIFIM-SMD_ESP32-S3-WROOM-1-N8 [mil]
  rect 59.1x35.4 smd paste+0: 1(-350.4,352.5) 2(-350.4,302.5) 3(-350.4,252.5) 4(-350.4,202.5) 5(-350.4,152.5) 6(-350.4,102.5) 7(-350.4,52.5) 8(-350.4,2.5) 9(-350.4,-47.5) 10(-350.4,-97.5) 11(-350.4,-147.5) 12(-350.4,-197.5) 13(-350.4,-247.5) 14(-350.4,-297.5) 27(350.4,-297.5) 28(350.4,-247.5) 29(350.4,-197.5) 30(350.4,-147.5) 31(350.4,-97.5) 32(350.4,-47.5) 33(350.4,2.5) 34(350.4,52.5) 35(350.4,102.5) 36(350.4,152.5) 37(350.4,202.5) 38(350.4,252.5) 39(350.4,302.5) 40(350.4,352.5)
  rect 35.4x59.1 smd paste+0: 15(-275,-352.6) 16(-225,-352.6) 17(-175,-352.6) 18(-125,-352.6) 19(-75,-352.6) 20(-25,-352.6) 21(25,-352.6) 22(75,-352.6) 23(125,-352.6) 24(175,-352.6) 25(225,-352.6) 26(275,-352.6)
  rect 35.4x35.4 smd: 41(-114.1,48.6) 41(-114.1,103.7) 41(-114.1,-6.5) 41(-59,103.7) 41(-59,48.6) 41(-59,-6.5) 41(-3.9,103.7) 41(-3.9,48.6) 41(-3.9,-6.5)
  silkscreen extent -354,-357 354,647, body extent -354,-357 354,647, height 128

## Part data
200: library part H_Male_2x1_TH_100mil, "H_Male_2x1_TH_100mil", ComponentLink1Description=LCSC
500 501: library part H_Male_7x1_TH_100mil, "H_Male_7x1_TH_100mil", ComponentLink1Description=LCSC
C100 C108: library part "CAP CER 15pF 50V NP0 0603", "Capacitance:15pF Tolerance:±5% Tolerance:±5% Voltage Rating:50V Temperature Coefficient:C0G", Manufacturer 1=Chinocera, Manufacturer Part Number 1=HGC0603G0150J500NTHJ, Supplier Part Number 1=C465156, ComponentLink1Description=LCSC, ComponentLink1URL=https://www.lcsc.com/product-detail/C465156.html?s_z=n_q_HGC0603G0150J500NTHJ, Supplier 1=LCSC
C101 C404: library part "CAP CER 1uF 50V X7R 0603", "Capacitance:1uF Tolerance:±20% Tolerance:±20% Voltage Rating:50V Ripple Current:- Equivalent Series Resistance(ESR):- Diameter:4mm Height - Seated (Max):5.4mm Lifetime:1000hrs@105℃ Operating Temperature:-45℃~+105℃ Operating Temperature:-45℃~+105℃", Manufacturer 1="Samsung Electro-Mechanics", Supplier Part Number 1=C5199872, ComponentLink1Description=LCSC, ComponentLink1URL=https://www.lcsc.com/es/product-detail/C5199872.html?spm=wm.fly.bg.9.xh&lcsc_vid=ElBYBFACR1JaVQdSQ1NeBFwHFAdfUFIFEwUNXlwCEVQxVlNfRlVWUFNWT1hWUDtW, Manufacturer Part Number 1=CL10B105KB8NQNC, Supplier 1=LSCS
C102 C105 C107 C109 C111 C112 C113 C401 C403 C501 C503: library part "CAP CER 100nF 25V X7R 0603", "CAP CER 100nF 25V X7R 0603", Manufacturer 1="AIDE CAPACITOR", Manufacturer Part Number 1=0603X7R104K250NT, Supplier Part Number 1=C48579280, ComponentLink1Description=LCSC, ComponentLink1URL=https://www.lcsc.com/product-detail/C465156.html?s_z=n_q_HGC0603G0150J500NTHJ, Supplier 1=LCSC
C103 C104 C106 C110 C200 C208 C209 C500 C502: library part "CAP CER 10uF 16V X5R 0805", "CAP CER 10uF 16V X5R 0805", Manufacturer 1=muRata, Manufacturer Part Number 1=GRM21BR61C106KE15L, Supplier Part Number 1=C77075, ComponentLink1Description="New link", ComponentLink1URL=https://www.lcsc.com/es/product-detail/C77075.html?spm=wm.fly.bg.11.xh___wm.fly.dhl.mly.13-0-3&lcsc_vid=ElBYBFACR1JaVQdSQ1NeBFwHFAdfUFIFEwUNXlwCEVQxVlNfRlVWUFNWT1hWUDtW, Supplier 1=LCSC
C201 C202: library part CAP_ELEC_30F_TH, "Capacitance:30F Tolerance:0%~+30% Tolerance:0%~+30% Voltage Rating:2.7V Pin Spacing:7.5mm Diameter:18mm Height - Seated (Max):26mm Operating Temperature:-40℃~+70℃ Operating Temperature:-40℃~+70℃", Manufacturer 1=KAMCAP, Manufacturer Part Number 1=HP-2R7-J306VYJ23, Supplier Part Number 1=C7436773, ComponentLink1Description=LCSC, ComponentLink1URL=https://www.lcsc.com/product-detail/C7436773.html?s_z=n_q_HP-2R7-J306VYJ23, Supplier 1=LCSC
C203: library part "CAP CER 4.7uF 16V X5R 0603", "CAP CER 4.7uF 16V X5R 0603", Manufacturer Part Number 1=CL10A475KO8NNNC, Supplier Part Number 1=C19666, ComponentLink1Description="New link", ComponentLink1URL=https://www.lcsc.com/es/product-detail/C19666.html?spm=wm.fly.bg.0.xh___wm.fly.tp.3.ml&lcsc_vid=T1JZUwUCEwNbBlAHEwBdAVwDRAQPAV1eEVFfVgECQlMxVlNfRFdeV1BRRFhaUzsOAxUeFF5JWBYZEEoKFBINSQcJGk4LFEsFFhULAAsUDk5dV0oOAwwC, Manufacturer 1="Samsung Electro-Mechanics", Supplier 1=LCSC
C207: library part CAP_AL_4.7uF_SMD, "Capacitance:4.7uF Tolerance:±20% Tolerance:±20% Voltage Rating:25V Diameter:4mm Height - Seated (Max):5.4mm Operating Temperature:-40℃~+105℃ Operating Temperature:-40℃~+105℃", Manufacturer 1=ROQANG, Manufacturer Part Number 1=RVT1E4R7M0405, Supplier Part Number 1=C41435083, ComponentLink1Description=LCSC, ComponentLink1URL=https://www.lcsc.com/es/product-detail/C41435083.html?s_z=n_q_t_capacitor&spm=wm.fly.bg.1.xh___wm.ssy.tc.4.tz&lcsc_vid=T1EMUlBeR1ALUlVSFANeUFcFR1BWV1EHFVFaA1dQElAxVlNfRlJaV1FUQldbXzsOAxUeFF5JWBYZEEoKFBINSQcJGk4NBhYS, Supplier 1=LCSC
C300 C301 C302 C303 C304 C305 C306 C307 C308 C309 C310 C311 C312 C313: library part "CAP_CER_33nF X7R ±5% 50V", "33nF X7R ±5% 50V 0603 Ceramic Capacitors RoHS", Manufacturer 1="AIDE CAPACITOR", Manufacturer Part Number 1=0603X7R333J500NT, Supplier Part Number 1=C49326639, ComponentLink1Description=LCSC, ComponentLink1URL=https://www.lcsc.com/product-detail/C49326639.html?s_z=n_q_AIDE%2520CAPACITOR%25200603X7R333J500NT&spm=wm.fly.bg.0.xh&lcsc_vid=FFRdVwAETgNbVwAHTlRdV1UFEwcIU1ZXQVZZAlYFQAcxVlNfRlJdU1VSRlReXjsOAxUeFF5JWBYZEEoKFBINSQcJGk4LFEsFFhULAAsUDk5fVl1fWQkaCgg%3D, Supplier 1=LCSC
C400: library part "CAP CER 22uF 10V X5R 0805", "CAP CER 22uF 10V X5R 0805", Manufacturer 1=Chinocera, Manufacturer Part Number 1=HGC0805R5226K100NSLJ, Supplier Part Number 1=C7432777, ComponentLink1Description=LCSC, ComponentLink1URL=https://www.lcsc.com/es/product-detail/C7432777.html?spm=wm.fly.bg.4.xh___wm.fly.dhl.mly.13-0-3&lcsc_vid=ElBYBFACR1JaVQdSQ1NeBFwHFAdfUFIFEwUNXlwCEVQxVlNfRlVWUFNWT1hWUDtW, Supplier 1=LCSC
D200 D201 D202: library part DIOD_SHOT_2A, "30V 1 Independent 125mV@1mA 1.5A SOD-123F Single Diodes RoHS", Manufacturer 1=onsemi, Manufacturer Part Number 1=MBRA210LT3G, Supplier Part Number 1=C145190, ComponentLink1Description=LCSC, ComponentLink1URL=https://www.lcsc.com/product-detail/C145190.html, Supplier 1=LCSC
D203: library part LED_0805_RED, "LED RED CLEAR 0805 SMD", Manufacturer=XINGLIGHT, Manufacturer Part Number=XL-2012SURC, Supplier Part Number 1=C965812, ComponentLink1Description=LCSC, ComponentLink1URL=https://www.lcsc.com/product-detail/Light-Emitting-Diodes-LED_XINGLIGHT-XL-2012SURC_C965812.html, Supplier 1=LCSC
D204 D205: library part LED_0805_Green, "LED GREEN CLEAR 0805 SMD", Manufacturer=XINGLIGHT, Manufacturer Part Number=XL-2012UGC, Supplier Part Number 1=C965815, ComponentLink1Description=LCSC, ComponentLink1URL=https://www.lcsc.com/product-detail/Light-Emitting-Diodes-LED_XINGLIGHT-XL-2012UGC_C965815.html, Supplier 1=LCSC
D500: library part sm712_c908219_RS485, "Polarity:Bidirectional Reverse Stand-Off Voltage (Vrwm):7V Clamping Voltage:20V Peak Pulse Current (Ipp):18A Peak Pulse Power Dissipation (Ppp):360W Voltage - Breakdown:13.3V Reverse Leakage Current (Ir):1uA Number of Channels:2 Operating Temperature:-55℃", Manufacturer 1=FUXINSEMI, Manufacturer Part Number 1=SM712, ComponentLink1Description="New link", ComponentLink1URL=https://www.lcsc.com/es/product-detail/C908219.html?s_z=n_q_p_sm712_c908219&spm=wm.ssy.bg.0.xh&lcsc_vid=FFRdVwAETgNbVwAHTlRdV1UFEwcIU1ZXQVZZAlYFQAcxVlNfRlJdUlJTQlRWXjsOAxUeFF5JWBYZEEoKFBINSQcJGk4LFEsWBQ4KEgcSWgULEwUPG04tVVZVT1BdXlVIHxUDCw%3D%3D, Supplier 1=LCSC, Supplier Part Number 1=C908219
F300 F301 F302: library part FUSE_MOV_JFC2410, "Surface Mount Fuse 200mA 250V 2410 Fuses", Manufacturer 1=JDTfuse, Manufacturer Part Number 1=JFC2410-0200TS, Supplier Part Number 1=C55058769, ComponentLink1Description=LCSC, ComponentLink1URL=https://www.lcsc.com/product-detail/C55058769.html?s_z=n_q_JFC2410-0200TS, Supplier 1=LCSC
FB100 FB202 FB400 FB500 FB501 FB502 FB503: library part "FERR_10mohms 15o@100MHz", "10mΩ 15Ω@100MHz 0603 Ferrite Beads and Chips", Manufacturer 1=Yanchuang, Manufacturer Part Number 1=SCBM160808U090T, Supplier Part Number 1=C52205324, ComponentLink1Description=LCSC, ComponentLink1URL=https://www.lcsc.com/es/product-detail/C52205324.html?s_z=s_c_Ferrite%2520Beads%2520and%2520Chips&spm=wm.fly.bg.0.xh&lcsc_vid=T1EMUlBeR1ALUlVSFANeUFcFR1BWV1EHFVFaA1dQElAxVlNfRlJaVFNSQlhYUjsOAxUeFF5JWBYZEEoKFBINSQcJGk4LFEsFFhULAAsUDk5fVlNWWQkaCgg%3D, Supplier 1=LCSC
j400: library part CON_USB_TYPEC_16P, "3A USB 3.1 1 Surface Mount 16P Female -40℃~+85℃ Type-C SMD USB Connectors ROHS", Manufacturer 1="SHOU HAN", Manufacturer Part Number 1=TYPE-C-3.1-16PIN, Supplier Part Number 1=C7507405, ComponentLink1Description=LCSC, ComponentLink1URL=https://lcsc.com/product-detail/USB-Connectors_SHOU-HAN-TYPE-C-3-1-16PIN_C7507405.html, Supplier 1=LCSC
J500: library part Con_3x1_TH_5mm, "1x3P 10A -40℃~+105℃ 300V Green 14~26 Through Hole 5mm 2.5 1 3 Plugin,P=5mm Screw Terminal Blocks ROHS", Manufacturer 1=MAX, Manufacturer Part Number 1=MX126-5.0-03P-GN01-Cu-S-A, Supplier Part Number 1=C5188435, ComponentLink1Description=Digi-Key, ComponentLink1URL=https://lcsc.com/product-detail/Screw-Terminal-Blocks_MAX-MX126-5-0-03P-GN01-Cu-S-A_C5188435.html, Supplier 1=LCSC
L200: library part "IND 3.9uH 2.3A 57mohms", "Inductance:3.9uH Tolerance:±20% Tolerance:±20% Current Rating:2.3A Current - Saturation(Isat):3.3A DC Resistance(DCR):57mΩ Type:Magnetic Shielded Inductor", Manufacturer 1=ZE, Manufacturer Part Number 1=ZNR4030ST3R9M, Supplier Part Number 1=C42429307, ComponentLink1Description=LCSC, ComponentLink1URL=https://www.lcsc.com/product-detail/C42429307.html?s_z=n_q_ZNR4030ST3R9M, Supplier 1=LCSC
PS200: library part HLK-10M05, "10W Ultra-Compact Power Module", Manufacturer 1=HI-LINK, Manufacturer Part Number 1=HLK-10M05T, ComponentLink1Description=LCSC, ComponentLink1URL=https://www.lcsc.com/es/product-detail/C52746092.html?s_z=n_q_HLK-10M05&spm=wm.fly.bg.1.xh&lcsc_vid=FFRdVwAETgNbVwAHTlRdV1UFEwcIU1ZXQVZZAlYFQAcxVlNfRlJdUlVUT1RdXzsOAxUeFF5JWBYZEEoKFBINSQcJGk4LFEsWBQ4KEgcSWgULEwUPG04tVVxVQFFXVUoOAwwC, Supplier 1=LCSC, Supplier Part Number 1=C52746092
R100 R101 R102 R104 R400 R403 R500 R502 R503 R504 R505 R506 R507: library part "RES_10kohms 100mW 75V", "10kΩ 100mW 75V Thick Film Resistor ±100ppm/℃ ±1% 0603 Chip Resistor - Surface Mount", Manufacturer 1=SAE, Manufacturer Part Number 1=1RC0603F1002, Supplier Part Number 1=C53224186, ComponentLink1Description="New link", ComponentLink1URL=https://www.lcsc.com/es/product-detail/C53224186.html?spm=wm.fly.bg.4.xh___wm.fly.dhl.mly.13-6-1&lcsc_vid=T1EMUlBeR1ALUlVSFANeUFcFR1BWV1EHFVFaA1dQElAxVlNfRlJaV1FUQldbXzsOAxUeFF5JWBYZEEoKFBINSQcJGk4NBhYS, Supplier 1=LCSC
R103 R200 R202 R300 R309 R310 R311 R312 R320 R322 R323 R324 R332 R334 R335 R336 R339: library part "RES 1kohms ±1% 100mW 0603", "RES 1kΩ ±1% 100mW 0603", Manufacturer 1=FOJAN, Manufacturer Part Number 1=FRC0603F1001TS, Supplier Part Number 1=C2907002, ComponentLink1Description="New link", ComponentLink1URL=https://www.lcsc.com/es/product-detail/C2907002.html?spm=wm.fly.bg.1.xh___wm.fly.dhl.mly.13-6-1&lcsc_vid=T1EMUlBeR1ALUlVSFANeUFcFR1BWV1EHFVFaA1dQElAxVlNfRlJaV1FUQldbXzsOAxUeFF5JWBYZEEoKFBINSQcJGk4NBhYS, Supplier 1=LCSC
R201 R207: library part "RES 3900mohms ±5% 2W 2512", "Type:Thick Film Resistor Resistance:3.9Ω Tolerance:±5% Tolerance:±5% Power(Watts):2W Voltage-Supply(Max):300V Operating Temperature:-55℃~+155℃ Operating Temperature:-55℃~+155℃", Manufacturer 1=sds, Manufacturer Part Number 1=dsd, Supplier 1=LCSC, Supplier Part Number 1=sds
R203: library part "RES_120ohms 50V", "100mW 120 50V Thick Film Resistor ±1% ±100ppm/℃ 0603 Chip Resistor - Surface Mount", Manufacturer 1="HWA CHN", Manufacturer Part Number 1=HRC0603F1200ENTNV, Supplier Part Number 1=C54920849, ComponentLink1Description="New link", ComponentLink1URL=https://www.lcsc.com/es/product-detail/C54920849.html?spm=wm.fly.bg.0.xh___wm.fly.dhl.mly.13-6-1&lcsc_vid=T1EMUlBeR1ALUlVSFANeUFcFR1BWV1EHFVFaA1dQElAxVlNfRlJaV1FUQldbXzsOAxUeFF5JWBYZEEoKFBINSQcJGk4NBhYS, Supplier 1=LCSC
R204 R501: library part "RES 120ohms 100mW150V Thick Film Resistor  ±100ppm 0805", Manufacturer 1="HWA CHN", Manufacturer Part Number 1=HRC0805F1200FNTN, Supplier Part Number 1=C54921099, ComponentLink1Description="New link", ComponentLink1URL=https://www.lcsc.com/product-detail/C48996813.html, Supplier 1=LCSC
R205: library part Res_84R5_0603_1/10W, "100mW Thick Film Resistor 50V ±100ppm/℃ ±1% 84.5Ω 0603 Chip Resistor - Surface Mount ROHS", Manufacturer="LIZ Elec", Manufacturer Part Number=CR0603FA84R5G, Supplier Part Number 1=C101216, ComponentLink1Description=LCSC, ComponentLink1URL=https://lcsc.com/product-detail/Chip-Resistor-Surface-Mount_LIZ-Elec-CR0603FA84R5G_C101216.html, Supplier 1=LCSC
R206: library part Res_330R_0603_1/10W, "RES SMD 330R OHM 5% 1/10W 0603", Manufacturer=FOJAN, Manufacturer Part Number="FRC0603J331 TS", Supplier Part Number 1=C2907152, ComponentLink1Description=LCSC, ComponentLink1URL=https://www.lcsc.com/product-detail/Chip-Resistor-Surface-Mount_FOJAN-FRC0603J331-TS_C2907152.html, Supplier 1=LCSC
R301 R302 R313 R321 R325 R333 R337 R338: library part "RES 5.1ohms ±1% 400mW 0603", "RES 5.1Ω ±1% 400mW 0603", Manufacturer 1="UNI-ROYAL HQ03W5F510KT5E", Manufacturer Part Number 1=HQ03W5F510KT5E, Supplier Part Number 1=C2791987, ComponentLink1Description="New link", ComponentLink1URL=https://www.lcsc.com/es/product-detail/C2907011.html?spm=wm.fly.bg.0.xh___wm.fly.tp.1.ml&lcsc_vid=TlUKUVJeQVYNVVcAFQBcBQJfRlgPUVYCQllYVwUHEQcxVlNfRFRfUVJUQ1JcXzsOAxUeFF5JWBYZEEoKFBINSQcJGk4LFEs%3D, Supplier 1=LCSC
R303 R304 R305 R306 R307 R308 R314 R315 R316 R317 R318 R319 R326 R327 R328 R329 R330 R331: library part "RES 165k ±0.1% 100mW 0603", "RES 165kΩ ±0.1% 100mW 0603", Manufacturer 1=YAGEO, Manufacturer Part Number 1=RT0603BRD07165KL, Supplier Part Number 1=C861150, ComponentLink1Description="New link", ComponentLink1URL=https://www.lcsc.com/product-detail/C861150.html, Supplier 1=LCSC
R401 R402: library part "RES 5.1Kohms ±1% 100mW 0603_1", "5.11kΩ 100mW 50V Thick Film Resistor ±1% ±100ppm/℃ 0603 Chip Resistor - Surface Mount", Manufacturer 1="HWA CHN", Manufacturer Part Number 1=HRC0603F5111ENTN, Supplier Part Number 1=C55098456, ComponentLink1Description="New link", ComponentLink1URL=https://www.lcsc.com/product-detail/C55098456.html, Supplier 1=LCSC
RV300 RV301 RV302: "470 V 4.5 kA Varistor 1 Circuit Through Hole Disc 14mm", Manufacturer 1=BOURNS, Supplier Part Number 1=C1527439, ComponentLink1Description=LCSC, ComponentLink1URL=https://www.lcsc.com/es/product-detail/C1527439.html?s_z=n_q_MOV-14D471K&spm=wm.fly.bg.0.xh&lcsc_vid=FFRdVwAETgNbVwAHTlRdV1UFEwcIU1ZXQVZZAlYFQAcxVlNfRlJdUlZRQlZXVjsOAxUeFF5JWBYZEEoKFBINSQcJGk4LFEsWBQ4KEgcSWgULEwUPG04tUlNXRlhYSQwSGg0%3D, ComponentLink2Description=Datasheet, ComponentLink2URL=https://www.lcsc.com/datasheet/C1527439.pdf, Manufacturer Part Number 1=MOV-14D471K, Supplier 1=LCSC
SW400 SW401: library part Sw_PUSH_4.5x4.5x5.0xmm, "SWITCH TACTILE SPST-NO 0.05A 12V", Manufacturer=BZCN, Manufacturer Part Number=TSC015A05026A, Supplier Part Number 1=C2888509, ComponentLink1Description=LCSC, ComponentLink1URL=https://www.lcsc.com/product-detail/Tactile-Switches_BZCN-TSC015A05026A_C2888509.html, Last modified by=N-A.Potosi, Last modified date=20190222, Supplier 1=LCSC
U100: "Meter Type:Polyphase Energy Metering IC Number of Channels:- Tolerance:0.1% Voltage - Supply:3V~3.6V Voltage - Supply:3V~3.6V Dynamic Range:10000:1 Interface:SPI Current - Supply:4.4mA Current - Supply:4.4mA Operating Temperature:-40℃~+85℃ Operating Tempe", Manufacturer 1=RENERGY, Manufacturer Part Number 1=RN8302B(V3), Supplier Part Number 1=C22381391, ComponentLink1Description=LCSC, ComponentLink1URL=https://www.lcsc.com/es/product-detail/C22381391.html?s_z=n_q_rn8302b%28v3%29&spm=wm.fly.bg.0.xh&lcsc_vid=FFRdVwAETgNbVwAHTlRdV1UFEwcIU1ZXQVZZAlYFQAcxVlNfRlJdUlFTRVNXXzsOAxUeFF5JWBYZEEoKFBINSQcJGk4LFEsWBQ4KEgcSWgULEwUPG04tU1VSTllfSQwSGg0%3D, Supplier 1=LCSC
U101: library part iso7741dwr, "Number of Forward Channels:3 Number of Reverse Channels:1 Data Rate(Max):100Mbps Default Output:High Level Isolation Voltage(Vrms):5000 CMTI(kV/us):100kV/us Propagation Delay(tpd):10.7ns Features:Channel direction configurable；Fail-safe output Voltage - S", Manufacturer 1=TI, Manufacturer Part Number 1=ISO7741DWR, ComponentLink1Description=LCSC, ComponentLink1URL=https://www.lcsc.com/es/product-detail/C571196.html?s_z=n_q_iso7741dwr&spm=wm.fly.bg.0.xh&lcsc_vid=FFRdVwAETgNbVwAHTlRdV1UFEwcIU1ZXQVZZAlYFQAcxVlNfRlJdUlZUQVBeVTsOAxUeFF5JWBYZEEoKFBINSQcJGk4LFEsWBQ4KEgcSWgULEwUPG04tUlZRQ1deXlZIHxUDCw%3D%3D, Supplier 1=LCSC, Supplier Part Number 1=C571196
U200: "Function:Step-down type Voltage - Supply:3.4V~5.5V Voltage - Supply:3.4V~5.5V Output Voltage:3.3V Output Voltage:3.3V Output Current:1.3A Frequency - Switching:1MHz Frequency - Switching:1MHz Operating Temperature:-40℃~+85℃@(TA) Operating Temperature:-40℃", Frequency - Switching=1MHz, JLCPCB Part Class="Extended Part", LCSC Part Name="降压型 3.4V~5.5V", Manufacturer=HEXIN(禾芯微), ManufacturerPart=HX1002-GEC, Operating Temperature=-40℃~+85℃@(TA), Output Current=1.3A, Output Voltage=3.3V, Quiescent Current=200uA, Voltage - Supply=3.4V~5.5V, AddInBom=yes, ConvertToPcb=yes, Datasheet=https://item.szlcsc.com/datasheet/HX1002-GEC/49305273.html, Features="Light load efficient mode；Overcurrent Protection", FootprintName=SOT-23-5_L2.9-W1.6-P0.95-LS2.9-BL, Function="Step-down type", ModelId=2f383b92320f41da89c9910a54c9b99b, ModelName=SOT-23-5_L2.9-W1.6-P0.95-LS2.9-BL, ModelTransform=114.173,114.173,0,0,0,0,0,-0.003,0, Number of Outputs=1, Output Type=Fixed, Supplier=LCSC, Supplier Footprint=SOT-23-5L, SupplierPart=C47115461, Switch tube (built-in/external)=Built-in, Symbol=HX1002-GEC, Synchronous Rectifier=Yes, Topology=Buck
U202: "Type:Plastic encapsulated type Number of Outputs:1 Output Power:1W Voltage - Supply:4.5V~5.5V Voltage - Supply:4.5V~5.5V Conversion Efficiency:74% Conversion Efficiency:74% Output Voltage:3.3V Output Voltage:3.3V Output Current(Max):303mA Output Current(M", Manufacturer 1=EVISUN(易成), Manufacturer Part Number 1=B0503S-1WR3, Supplier Part Number 1=C7465187, ComponentLink1Description=LCSC, ComponentLink1URL=https://www.lcsc.com/product-detail/C7465187.html?s_z=n_q_p_b0503s-1wr3_c7465187, Supplier 1=LCSC
U300 U302 U303 U304: "Connector Type:3.5mm Headphone Jack Current Rating:500mA Voltage Rating (Max):30V Operating Temperature:-30℃~+70℃ Operating Temperature:-30℃~+70℃ Rank Number:TRS Mounting Style:Right-Angle Body Height:5mm Length:14.1mm Width:6mm", Manufacturer 1=hanxia, Manufacturer Part Number 1="HX PJ-320A-3P DIP", Supplier Part Number 1=C19189087, ComponentLink1Description=LCSC, ComponentLink1URL=https://www.lcsc.com/product-detail/C19189087.html?s_z=n_q_hx%2520pj-320a-3p%2520dip, Supplier 1=LCSC
U301: library part BR_50126v-4p0g56, "Number of Positions or Pins:1x4P Pitch:5mm Color:Green Mounting Type:Through Hole Number of Pins:4P Number of Rows:1 Number of PINs Per Row:4 Current Rating:18A Voltage Rating (Max):250V Wire Gauge - AWG:14~26 Wire Gauge - mm2:0.5~2.5 Wire Gauge - mm2:0.5", Color=Green, Manufacturer 1=JXTCONN, Manufacturer Part Number 1=C50126V-4P0G56, Supplier Part Number 1=C49291885, ComponentLink1Description=LCSC, ComponentLink1URL=https://www.lcsc.com/es/product-detail/C49291885.html?spm=wm.fly.bg.2.xh&lcsc_vid=QARXAVUEQ1ELXl1fE1ZXXgVfFgdaUV1TRAUKVFNRFFAxVlNfRlVdU1NQQFdcUTtW, Supplier 1=LCSC
U400: library part TVS_5.25V_2CH_SOT_23_6, "TVS DIODE 5.25V 17V SOT23-6", Manufacturer 1=STMicroelectronics, Supplier Part Number 1=C7519, ComponentLink1Description=LCSC, ComponentLink1URL=https://www.lcsc.com/product-detail/ESD-Protection-Devices_STMicroelectronics-USBLC6-2SC6_C7519.html, Manufacturer Part Number 1=USBLC6-2SC6, Supplier 1=LCSC
U401: "Utilized IC / Part:ESP32-S3 Wireless Standard:Bluetooth5.0 Interface Type:I2C；GPIO；UART；SPI；USB；I2S Frequency:2.4GHz Antenna Type:On-board PCB Antenna Output Power:20.5dBm Output Power:20.5dBm Voltage - Supply:3V~3.6V Voltage - Supply:3V~3.6V Receive  Cur", Manufacturer 1=ESPRESSIF, Manufacturer Part Number 1=ESP32-S3-WROOM-1-N4, Operating Temperature=-40℃~+85℃, Supplier Part Number 1=C2913197, ComponentLink1Description=LCSC, ComponentLink1URL=https://www.lcsc.com/product-detail/C2913197.html?s_z=h_q_esp32-s3-wroom-1-n4, Supplier 1=LCSC, Symbol=ESP32-S3-WROOM-1-N4
U500: library part RS485_RSM3485PCT, "Data Rate:9.6Kbps ESD Protect:Yes Voltage - Supply:3.15V~3.45V Voltage - Supply:3.15V~3.45V isolation:2500V Number of Nodes:64 Quiescent Current:30mA Automatic flow control:No Operating Temperature:-40℃~+85℃ Operating Temperature:-40℃~+85℃", Manufacturer 1=VISOM, Manufacturer Part Number 1=RSM3485PCT, Supplier Part Number 1=C882105, ComponentLink1Description=LCSC, ComponentLink1URL=https://www.lcsc.com/es/product-detail/C882105.html?s_z=n_q_RSM3485PCT&spm=wm.fly.bg.0.xh&lcsc_vid=T1EMUlBeR1ALUlVSFANeUFcFR1BWV1EHFVFaA1dQElAxVlNfRlJbVlVWR1RZVzsOAxUeFF5JWBYZEEoKFBINSQcJGk4LFEsFFhULAAsUDk5cUVFIHxUDCw%3D%3D, Supplier 1=LCSC
U501: "Card Connection Mode:Push-Push Card Type:MicroSD Card (TF Card) Connector Type:Connector and Ejector Height Above Board:1.8mm Operating Temperature:-25℃~+90℃ Operating Temperature:-25℃~+90℃", Manufacturer 1=BXCONN, Manufacturer Part Number 1=TF-CARD-9P, Supplier Part Number 1=C53144700, ComponentLink1Description=LCSC, ComponentLink1URL=https://www.lcsc.com/es/product-detail/C53144700.html?s_z=n_q_tf-card-9p&spm=wm.fly.bg.0.xh&lcsc_vid=FFRdVwAETgNbVwAHTlRdV1UFEwcIU1ZXQVZZAlYFQAcxVlNfRlJdUlNWQ1NWXjsOAxUeFF5JWBYZEEoKFBINSQcJGk4LFEsWBQ4KEgcSWgULEwUPG04tXlReRVBXSQwSGg0%3D, Supplier 1=LCSC
X100: library part Crystal_049ss2, "Type:Crystal Oscillator Frequency:8.192MHz Normal temperature Frequency Tolerance:±20ppm Normal temperature Frequency Tolerance:±20ppm Load Capacitance:12pF Frequency Stability:±100ppm Frequency Stability:±100ppm Equivalent Series Resistance(ESR):60Ω Oper", Manufacturer 1=HCI, Manufacturer Part Number 1=049SS2-8.192F12DZLAL, Operating Temperature=-40℃~+125℃, Supplier Part Number 1=C19674267, ComponentLink1Description=LCSC, ComponentLink1URL=https://www.lcsc.com/es/product-detail/C19674267.html?s_z=n_q_049ss2-8.192f12dzlal&spm=wm.fly.bg.0.xh&lcsc_vid=FFRdVwAETgNbVwAHTlRdV1UFEwcIU1ZXQVZZAlYFQAcxVlNfRlJdU11WRldaVDsOAxUeFF5JWBYZEEoKFBINSQcJGk4LFEsWBQ4KEgcSWgULEwUPG04tUFBVQVZZVEoOAwwC, Supplier 1=LCSC

## Free pads (board coordinates)
  round 60 hole 30: 3(1076.94,3487.67) 3(1220,3490) 4(2420,3320) 5(2420,3140)

## Via types
v1: diameter 18, hole 12, Top Layer to Bottom Layer, tented both sides, 675 vias
v2: diameter 22, hole 12, Top Layer to Bottom Layer, tented both sides, 55 vias

## Nets (pads, with @x,y where several pads share a name; then routed paths per layer and width w, separated by ;. In a path a pad name is that pad's centre, name@x,y a point inside that pad or via, vN(x,y) a via of type N, cw(c..) or ccw(c..) an arc to the next point about the centre after c; other vN are vias at no path point)
3v3_ENER_IC: C101.2 C102.2 C103.2 C104.2 C105.2 C109.2 C112.2 FB100.1 R100.2 R102.1 R103.2 R104.2 U100.9 U100.28 U100.40 U100.41 U101.16 | length 2867.5
  Top Layer w6: C112.2@3098.5,3650 3098.5,3688.5 3110,3700 U100.28@3110,3754.2 ; v2(3250,4010) v2@3250.75,4010.75 ; U100.40@3335.05,4010.75 U100.40@3335.8,4011.5
  Top Layer w10: C102.2@2968.5,4351.5 C102.2@2971.5,4354.5 ; C102.2@2975.75,4344.25 2980,4340 2981.5,4340 2983.5,4338 2983.5,4336.5 2989.8,4336.5 v1(3016.34,4309.96) ; U100.9@3015.42,4205.88 3015.53,4205.98 v1@3015.53,4259.97 ; U100.9@3015.5,4205.8 3015.5,4154.5 3032.61,4137.39 v2@3237.39,4137.39 ; R103.2@3031.5,3650 C112.2@3098.5,3650 3100,3648.5 3100,3625.86 3115.86,3610 3280,3610 3290,3620 3290,3647 R102.1@3293,3650 R100.2@3348.5,3650 3384.14,3685.64 3464.36,3685.64 3472.22,3677.78 3567.78,3677.78 v2(3570,3680) ; U100.28@3110,3754.2 3110,3910 v2(3210,4010) ; v2@3250.75,4010.75 U100.40@3335.05,4010.75 ; U100.40@3335.8,4011.5 U100.41@3335.8,4043 3337.04,4041.76 3378.24,4041.76 3380,4040 3410,4070 3410,4137 3451.5,4178.5 C105.2@3451.5,4180 3458.59,4187.09 C103.2@3458.59,4270 3370,4270 3340,4240 v2(3340,4180) ; R104.2@3521.5,3780 3521.5,3778.5 3547.7,3752.3 3567.7,3752.3 v2(3570,3750)
  Top Layer w15: FB100.1@2818.5,4351.5 C109.2@2898.5,4351.5 C102.2@2968.5,4351.5 C101.2@3038.5,4351.5 C104.2@3101.41,4351.5 ; C102.2@2971.5,4340 C102.2@2980,4340 ; U100.9@3015.42,4205.88 U100.9@3015.5,4205.8 ; v2@3237.39,4137.39 v2(3237.39,4138.3) ; R104.2@3521.5,3780 3600,3780 3635,3815 U101.16@3703,3815
  Bottom Layer w10: v1(3015.57,4260) 3015.96,4260.39 3015.96,4309.57 v1(3016.34,4309.96) ; v2(3210,4010) v2(3250,4010) ; v2(3237.39,4138.3) 3298.3,4138.3 v2(3340,4180) ; v2(3570,3680) v2(3570,3750)
3v3_MCU: C113.2 C400.2 C401.2 FB400.1 R101.2 R400.2 R403.2 U101.1 U401.2 | length 4746.9
  Top Layer w10: C401.2@3810,3311.5 3811.5,3310 3840,3310 3950,3420 v1(3950,3660) ; C113.2@4030,4351.5 R101.2@4110,4351.5 4111.5,4350 4140,4350 4160,4330 4160,3850 4127.41,3817.41 4079.41,3817.41 U101.1@4077,3815 ; v2(4046.79,3499.06) 4046.79,3502.31 4030,3519.1 v2(4030,3660) 4030,3750 4060,3780 U101.1@4060,3811.49 ; v2(4220,3500) 4281.92,3438.08 v2(4316.29,3438.08) ; R403.2@4278.5,2270 4278.5,2206.13 4284.36,2200.27 4658.5,2200.27 ; v2(4400,3440) 4730.34,3440 v2(4731.82,3441.48) ; R400.2@4658.5,2270 4658.5,2200.27 ; U401.2@4808.8,3611.4 4808.8,3275.71 4920,3164.51 4920,2310 4810.27,2200.27 4658.5,2200.27
  Top Layer w15: FB400.1@3610,3311.5 3688.19,3311.5 C400.2@3690,3313.31 ; C400.2@3681.5,3321.81 C400.2@3690,3313.31 ; C401.2@3810,3311.5 3691.81,3311.5 C400.2@3690,3313.31 ; U101.1@4060,3811.49 4063.51,3815 U101.1@4077,3815
  Bottom Layer w10: v1(3950,3660) v2(4030,3660) ; v2(4046.79,3499.06) 4219.06,3499.06 v2(4220,3500) ; v2(4316.29,3438.08) 4398.08,3438.08 v2(4400,3440) ; v2(4731.82,3441.48) 4808.87,3441.48 v2(4809.28,3441.89)
3v3_RS485: C502.2 C503.2 FB500.1 R500.1 U500.1 | length 600.9
  Top Layer w10: U500.1@3460,2709.6 FB500.1@3460,2888.5 C503.2@3540,2888.5 3620,2888.5 3621.5,2890 v2(3670,2890) ; v2(3790,2940) 3858.5,2940 R500.1@3860,2941.5
  Bottom Layer w10: v2(3670,2890) 3719,2939 3789,2939 v2(3790,2940)
3v3_SD: C500.2 C501.2 FB501.1 R502.2 R503.2 R504.2 R505.1 R506.1 R507.1 U501.4 | length 858.1
  Bottom Layer w20: C500.2@4176.69,2780 4177.6,2779.1 4177.6,2690.9 R507.1@4178.5,2690 4179.25,2689.25 4179.25,2410 ; FB501.1@4180,2130 4179.25,2130.75 4179.25,2410 ; U501.4@4381.3,2421.3 4275.43,2421.3 4264.13,2410 4179.25,2410